# Altium PCB 48V-12V20A.PcbDoc (part 1 of 2)
Units mm, origin at the board's own origin, x right, y up, seen from the top; angles counter-clockwise.
Board outline 100 x 60 mm, 4 copper layers (Top Layer, GND02, POWER, Bottom Layer), stack 0.742 mm thick; 87 components, 43 nets, 281 pads, 430 vias.
Unrouted connection lines stored in the file: 18.
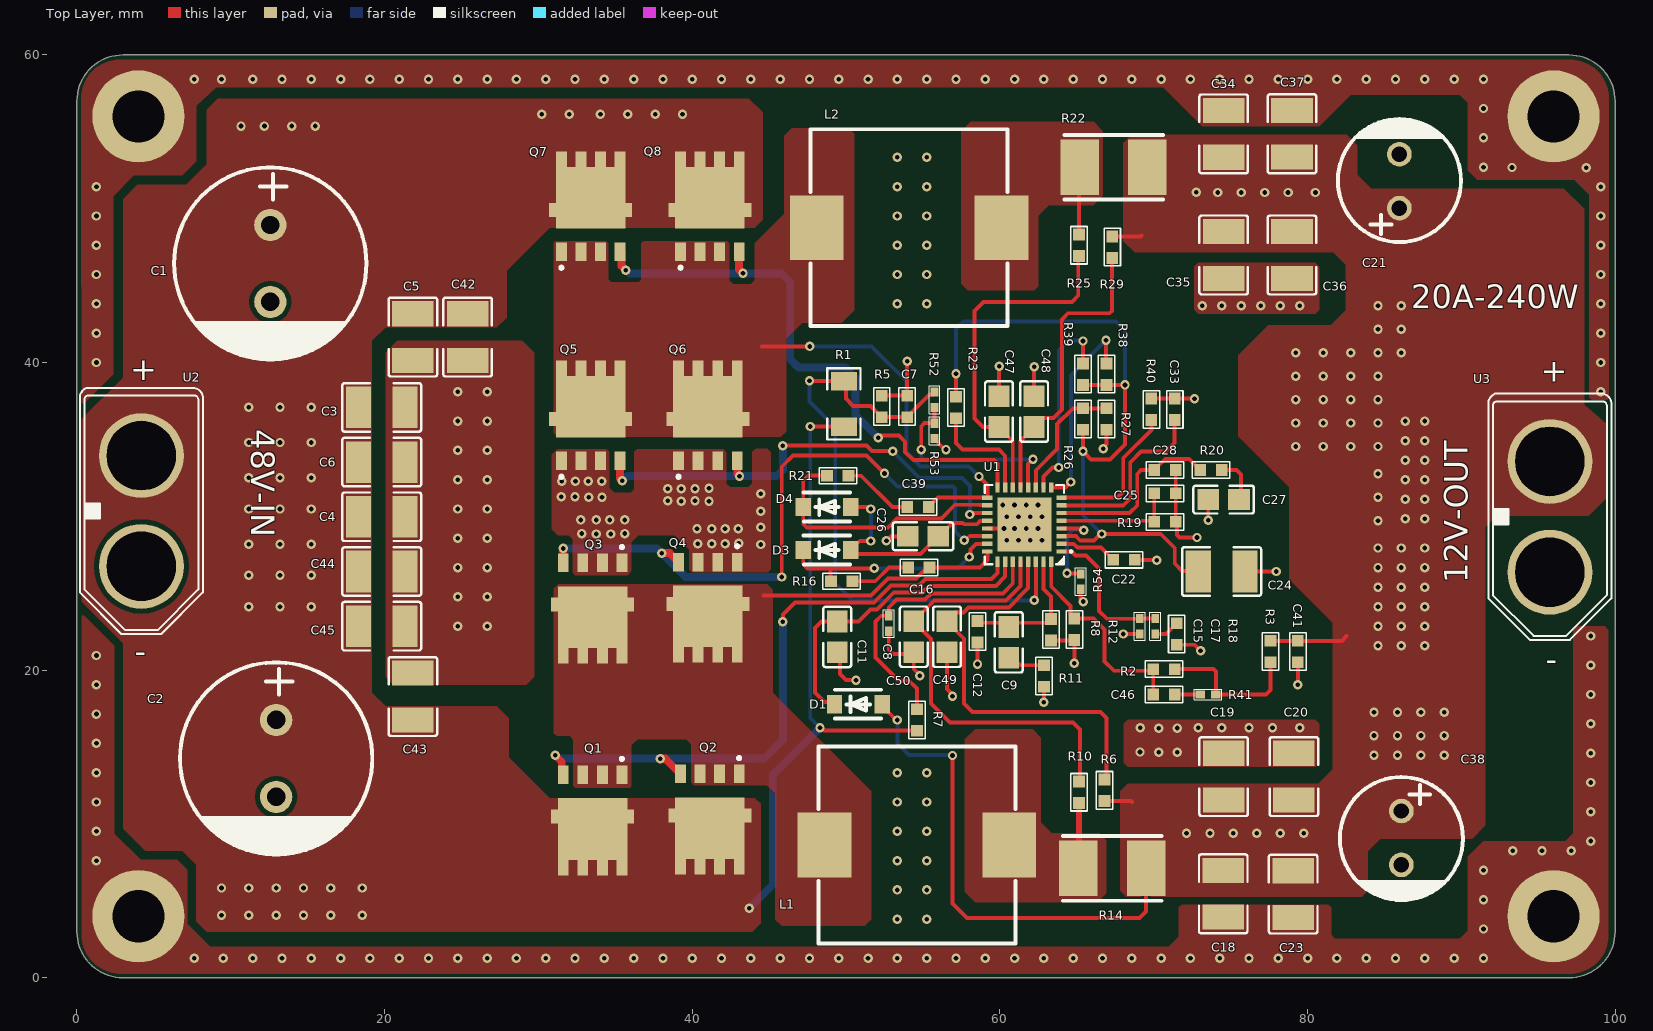
[diagram p0: Top Layer view]
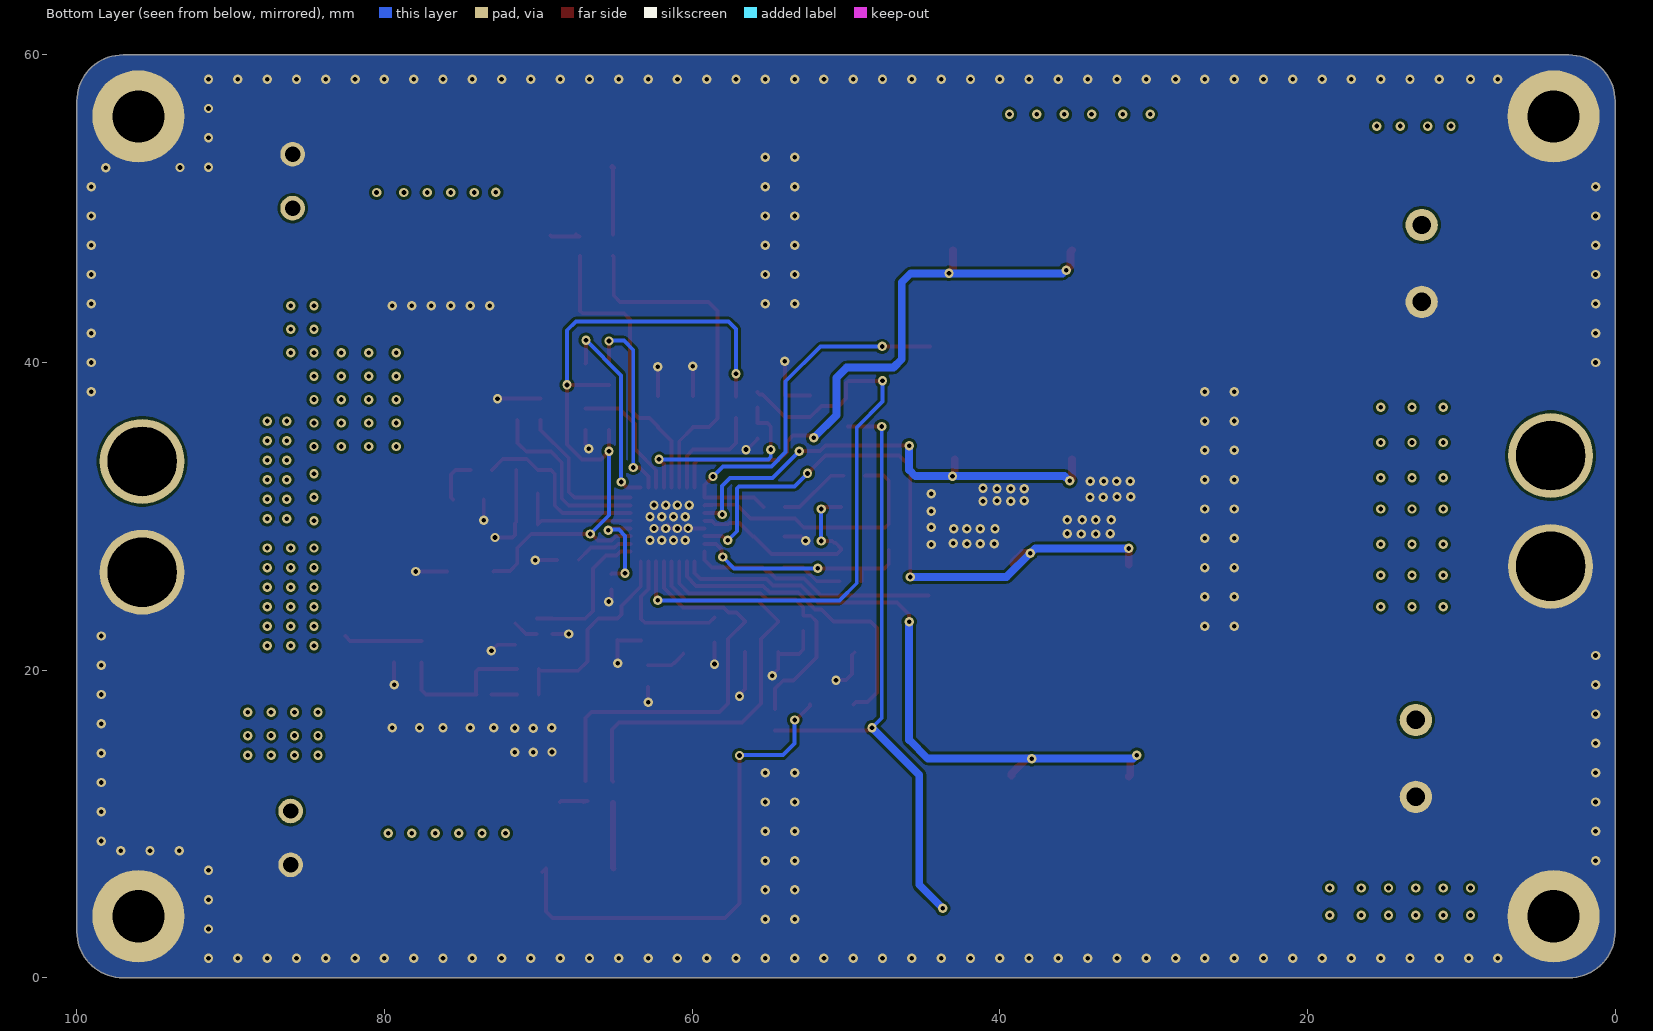
[diagram p1: Bottom Layer view, seen from below]
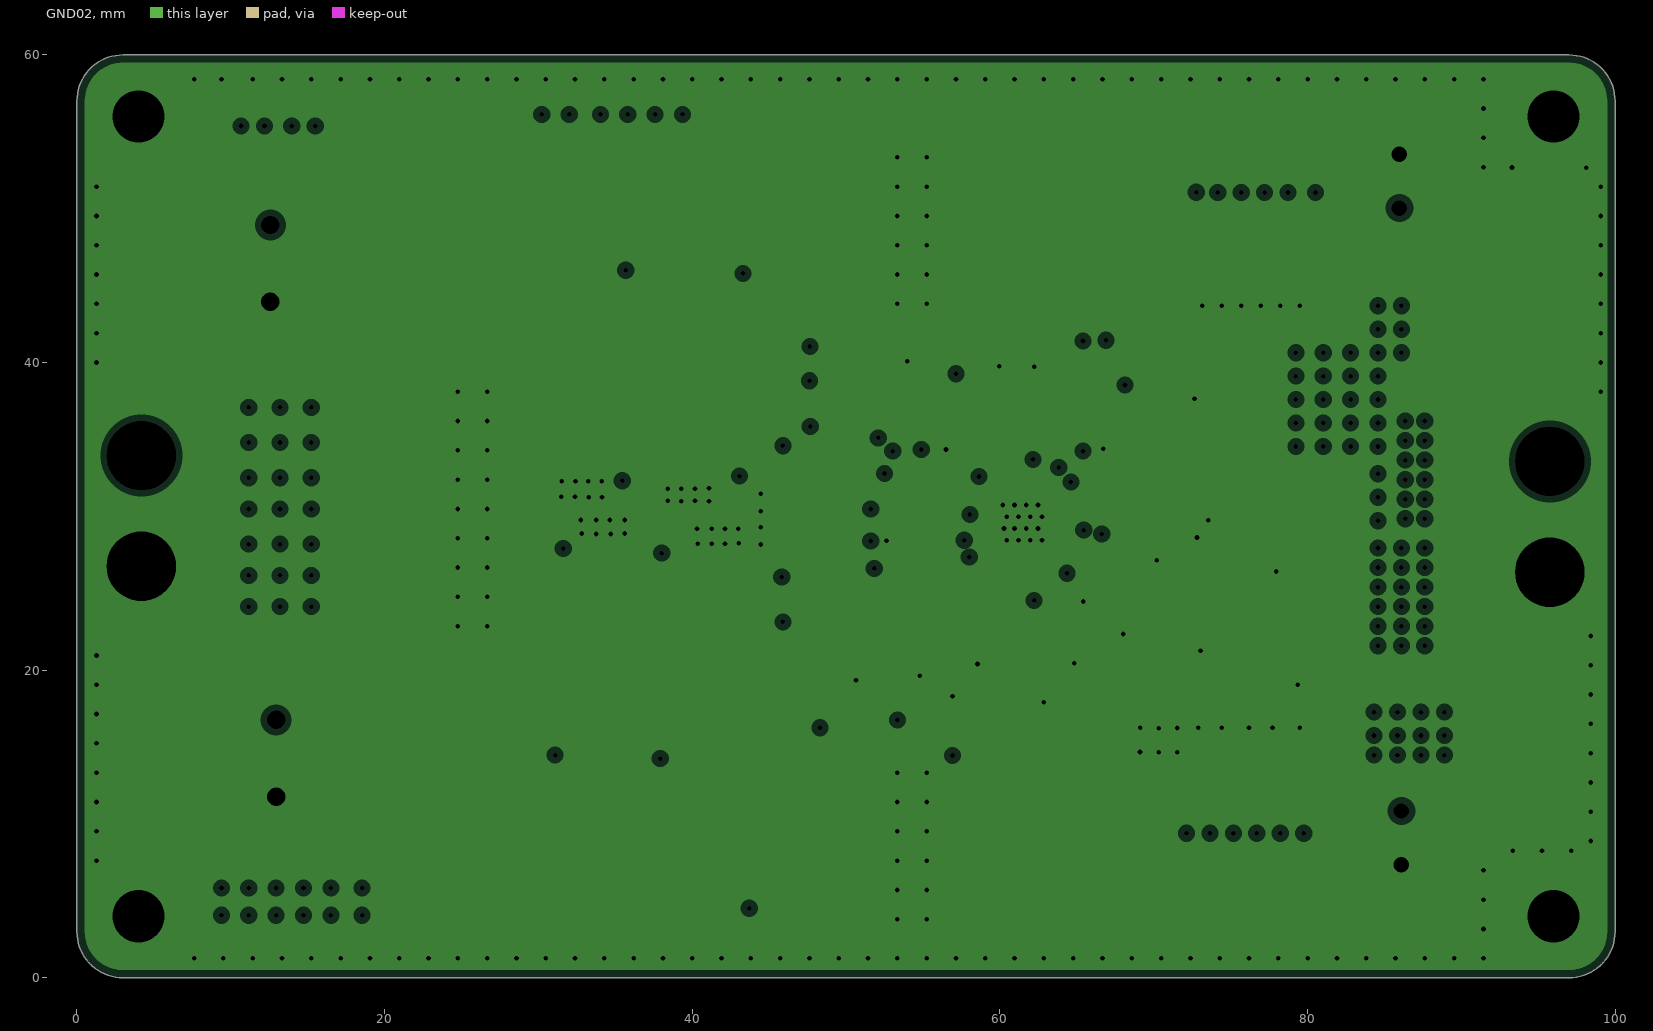
[diagram p2: GND02, clearances drawn from the general rule]
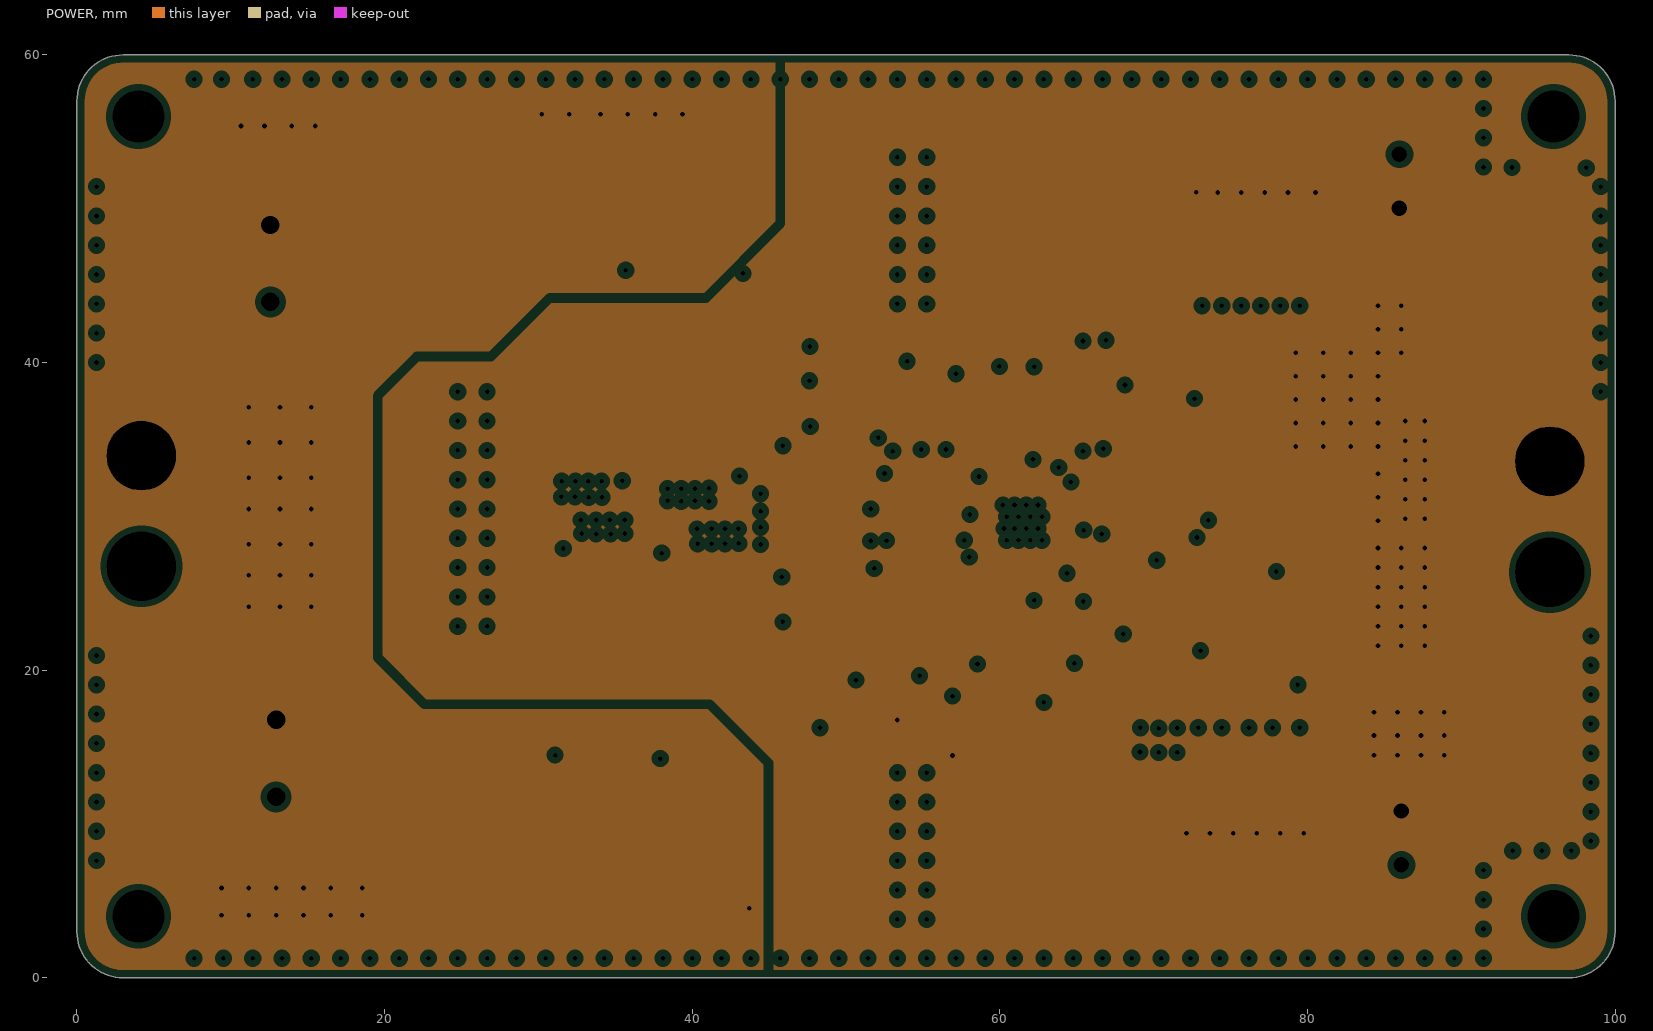
[diagram p3: POWER, clearances drawn from the general rule]
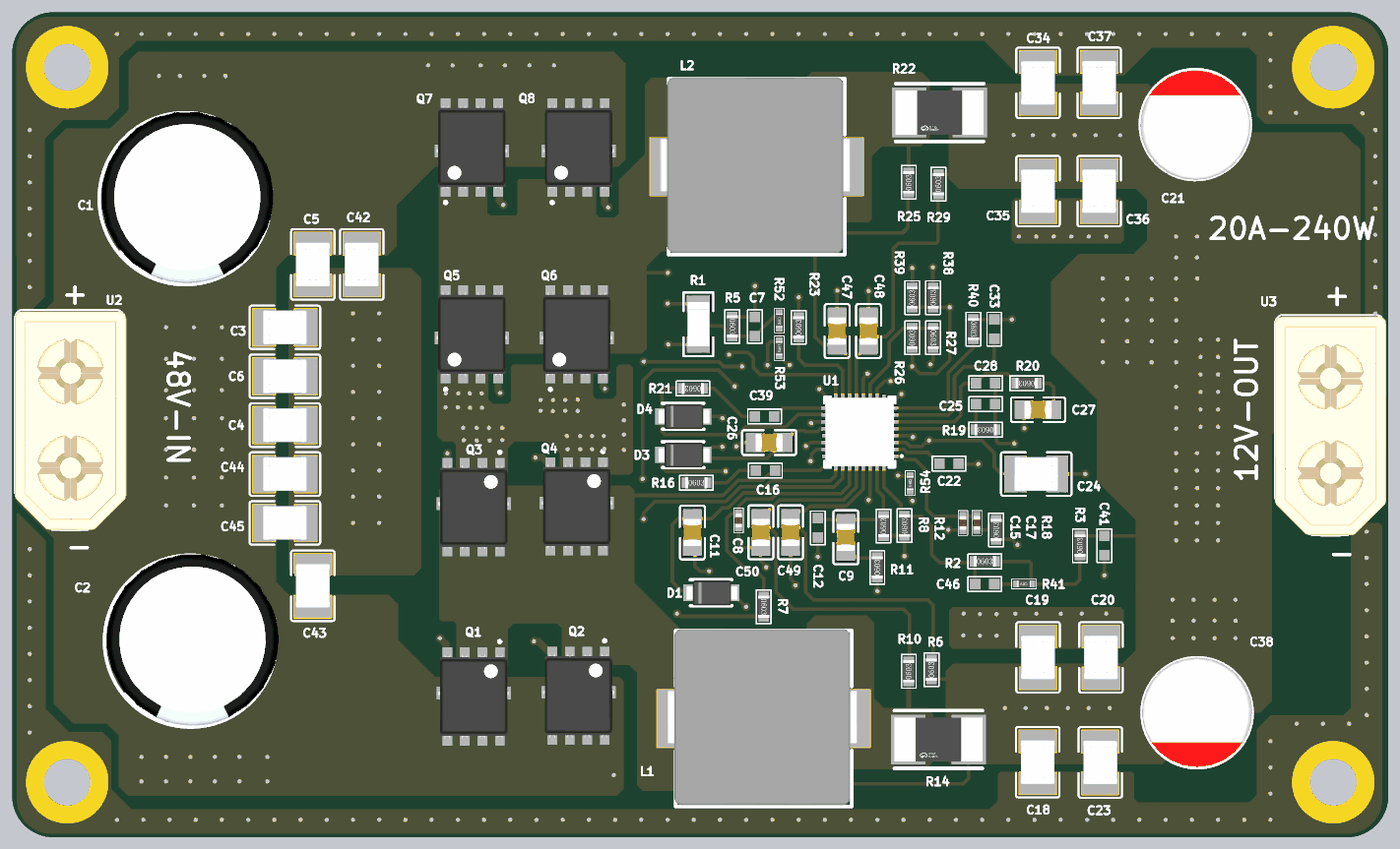
[diagram p4: 3D render of the assembled board from above, using the file's embedded part models]

## Layer stack, top to bottom
Top Solder: solder mask 0.0102, Solder Resist, Dk 3.5
Top Layer: signal copper 0.07
Dielectric 2: prepreg 0.0711, PP-006, Dk 4.1
GND02: plane copper 0.07, net GND
Dielectric 1: dielectric 0.32, FR-4, Dk 4.8
POWER: plane copper 0.07, net 12V
Dielectric 3: prepreg 0.0711, PP-006, Dk 4.1
Bottom Layer: signal copper 0.07
Bottom Solder: solder mask 0.0102, Solder Resist, Dk 3.5

## Board outline
0,3 0,57 cw(c3,57) 3,60 97,60 cw(c97,57) 100,57 100,3 cw(c97,3) 97,0 3,0 cw(c3,3)

## Design rules (kind name [scope] priority, off if disabled: settings)
Clearance [All] p1: gap=0.178 ignorepadtopadclearanceinfootprint=FALSE
DiffPairsRouting 100ohm [InDifferentialPairClass('100OHM')] p1: maxlimit=0.203 minlimit=0.203 mostfreqgap=0.203 toplayer_minwidth=0.152 toplayer_maxwidth=0.152 toplayer_prefwidth=0.152 bottomlayer_minwidth=0.152 bottomlayer_maxwidth=0.152 bottomlayer_prefwidth=0.152 maxuncoupledlength=12.7
DiffPairsRouting 120ohm [InDifferentialPairClass('120OHM')] p2: maxlimit=0.178 minlimit=0.178 mostfreqgap=0.178 toplayer_minwidth=0.127 toplayer_maxwidth=0.127 toplayer_prefwidth=0.127 bottomlayer_minwidth=0.127 bottomlayer_maxwidth=0.127 bottomlayer_prefwidth=0.127 maxuncoupledlength=12.7
MatchedLengths [InDifferentialPairClass('All Differential Pairs')] p1: tolerance=0.127 checknetsindiffpair=TRUE checkdiffpairvsdiffpair=FALSE checkxsignals=FALSE checkothers=FALSE
PlaneClearance [All] p1: clearance=0.406
PlaneConnect PlaneConnect_PWR [InPadClass('PWR')] p1: planeconnectstyle=Direct reliefexpansion=0.508 reliefentries=4 reliefconductorwidth=0.254 reliefairgap=0.254
PlaneConnect [All] p2: planeconnectstyle=Direct reliefexpansion=0.508 reliefentries=4 reliefconductorwidth=0.762 reliefairgap=0.254
PolygonConnect PolygonConnect_PWR [InPadClass('PWR')] p1: connectstyle=Direct reliefconductorwidth=0.254 reliefentries=4 polygonreliefangle="90 Angle" airgapwidth=0.254
PolygonConnect [All] p2: connectstyle=Direct reliefconductorwidth=0.762 reliefentries=4 polygonreliefangle="90 Angle" airgapwidth=0.254
RoutingVias [All] p1: holewidth=0.305 width=0.61 viastyle="Through Hole" minholewidth=0.305 minwidth=0.61 maxholewidth=0.305 maxwidth=0.61
SilkToSilkClearance [All] p1: silktosilkclearance=0.003
SilkToSolderMaskClearance [IsPad] p1: minsilkscreentomaskgap=0.003 clearancetoexposedcopper=TRUE
SolderMaskExpansion [IsVia And Not (Name Like 'Test*')] p1: expansion=-0.61 istentingtop=TRUE
Width [All] p1: maxlimit=2.54 minlimit=0.178 preferedwidth=0.203 minimp=50.000000 maximp=50.000000 favimp=50.000000
25 further rules are at their usual default settings.

## Components (designator, comment, footprint, x,y, rotation, side; value= is the part's Value field where it differs from the comment)
C1 "220uF" CAP-TH_BD12.5-P5.00-D0.6-FD 12.573,46.442 r270 top
C2 "220uF" CAP-TH_BD12.5-P5.00-D0.6-FD 12.954,14.264 r270 top
C3 "4.7uF" C1210 19.819,37.084 r0 top
C4 "4.7uF" C1210 19.819,29.972 r0 top
C5 "4.7uF" C1210 21.844,41.656 r270 top
C6 "4.7uF" C1210 19.819,33.528 r0 top
C7 "1nF" C0603 53.975,37.148 r270 top
C8 "100nF" C0402 52.781,23.038 r270 top
C9 "10nF" C0805 60.579,21.809 r90 top
C11 "10uF" C0805 49.428,22.165 r270 top
C12 "100pF" C0603 58.547,22.504 r90 top
C15 "220pF" C0402 69.088,22.852 r90 top
C16 "470nF" C0603 54.737,26.67 r0 top
C17 "4.7nF" C0402 70.104,22.86 r90 top
C18 "22uF" C1210 74.524,5.461 r90 top
C19 "22uF" C1210 74.549,13.081 r270 top
C20 "22uF" C1210 79.121,13.081 r270 top
C21 "1000uF" CAP-TH_BD8.0-P3.50-D0.6-FD-H17.0 85.979,51.791 r90 top
C22 "47nF" C0603 68.072,27.178 r0 top
C23 "22uF" C1210 79.07,5.442 r90 top
C24 "10uF" C1210 74.422,26.416 r180 top
C25 "DNP" C0603 70.739,31.496 r180 top value=470pF
C26 "10uF" C0805 55.007,28.702 r180 top
C27 "10nF" C0805 74.549,31.09 r0 top
C28 "820pF" C0603 70.739,33.02 r180 top
C33 "DNP" C0603 71.374,36.957 r270 top value=470pF
C34 "22uF" C1210 74.549,54.864 r90 top
C35 "22uF" C1210 74.549,46.99 r270 top
C36 "22uF" C1210 78.994,46.99 r270 top
C37 "22uF" C1210 78.994,54.871 r90 top
C38 "1000uF" CAP-TH_BD8.0-P3.50-D0.6-FD-H17.0 86.106,9.093 r270 top
C39 "470nF" C0603 54.673,30.607 r180 top
C41 "100nF" C0603 79.375,21.209 r270 top
C42 "4.7uF" C1210 25.4,41.656 r270 top
C43 "4.7uF" C1210 21.844,18.288 r90 top
C44 "4.7uF" C1210 19.819,26.416 r0 top
C45 "4.7uF" C1210 19.819,22.86 r0 top
C46 "100pF" C0603 70.675,18.415 r0 top
C47 "10nF" C0805 59.944,36.814 r270 top
C48 "10nF" C0805 62.23,36.814 r270 top
C49 "10nF" C0805 56.566,22.174 r270 top
C50 "10nF" C0805 54.407,22.174 r270 top
D1 "MBR1H100SFT3G" SOD-123F_L2.8-W1.8-LS3.7-RD 50.8,17.78 r0 top
D3 "MBR1H100SFT3G" SOD-123F_L2.8-W1.8-LS3.7-RD 48.768,27.813 r0 top
D4 "MBR1H100SFT3G" SOD-123F_L2.8-W1.8-LS3.7-RD 48.768,30.607 r0 top
L1 "6.8uH" IND-SMD_L12.8-W12.8-LS13.8_CYA1265 54.61,8.636 r0 top
L2 "6.8uH" IND-SMD_L12.8-W12.8-LS13.8_CYA1265 54.102,48.768 r0 top
Q1 "RBE067N10R1SZN6#HB0" RBA80N10EANS4UA07 33.528,10.231 r180 top
Q2 "RBE067N10R1SZN6#HB0" RBA80N10EANS4UA07 41.148,10.287 r180 top
Q3 "RBE067N10R1SZN6#HB0" RBA80N10EANS4UA07 33.528,24.003 r180 top
Q4 "RBE067N10R1SZN6#HB0" RBA80N10EANS4UA07 41.021,24.059 r180 top
Q5 "RBE067N10R1SZN6#HB0" RBA80N10EANS4UA07 33.401,36.576 r0 top
Q6 "RBE067N10R1SZN6#HB0" RBA80N10EANS4UA07 41.021,36.576 r0 top
Q7 "RBE067N10R1SZN6#HB0" RBA80N10EANS4UA07 33.401,50.165 r0 top
Q8 "RBE067N10R1SZN6#HB0" RBA80N10EANS4UA07 41.148,50.165 r0 top
R1 "430kΩ" R1206 49.86,37.313 r270 top
R2 "48.7kΩ" R0603 70.675,20.066 r0 top
R3 "20Ω" R0603 77.597,21.209 r90 top
R5 "48.7kΩ" R0603 52.324,37.148 r270 top
R6 "1Ω" R0603 66.802,12.192 r90 top
R7 "5.1Ω" R0603 54.61,16.764 r270 top
R8 "21kΩ" R0603 63.322,22.631 r90 top
R10 "1Ω" R0603 65.151,12.065 r90 top
R11 "1kΩ" R0603 62.865,19.621 r90 top
R12 "3.48kΩ" R0603 64.846,22.657 r90 top
R14 "4mΩ" RES-SMD_L6.4-W3.2_RLP25 67.31,7.112 r0 top
R16 "3.3Ω" R0603 49.72,25.781 r0 top
R18 "21kΩ" R0603 71.501,22.352 r90 top
R19 "169kΩ" R0603 70.739,29.642 r180 top
R20 "2.7kΩ" R0603 73.724,33.02 r180 top
R21 "3.3Ω" R0603 49.467,32.639 r180 top
R22 "4mΩ" RES-SMD_L6.4-W3.2_RLP25 67.396,52.705 r0 top
R23 "100kΩ" R0603 57.15,37.084 r90 top
R25 "1Ω" R0603 65.151,47.625 r90 top
R26 "100kΩ" R0603 65.405,36.322 r90 top
R27 "DNP" R0603 66.929,36.322 r270 top value=100kΩ
R29 "1Ω" R0603 67.31,47.498 r90 top
R38 "48.7kΩ" R0603 66.929,39.243 r90 top
R39 "48.7kΩ" R0603 65.405,39.243 r90 top
R40 "48.7kΩ" R0603 69.85,36.957 r270 top
R41 "0Ω" R0402 73.533,18.415 r0 top
R52 "0Ω" R0402 55.753,37.584 r90 top
R53 "DNP" R0402 55.753,35.56 r90 top value=22Ω
R54 "0Ω" R0402 65.253,25.756 r90 top
U1 "ISL81802FRTZ-T" TQFN-32_L5.0-W5.0-P0.50-TL-EP3.5 61.595,29.464 r180 top
U2 "XT60PB-M.G.Y" CONN-TH_XT60PB-M 4.191,30.353 r90 top
U3 "XT60PB-M.G.Y" CONN-TH_XT60PB-M 95.758,29.972 r90 top

## Footprints (in the part's own frame and the unit in brackets; to place one, negate y for a bottom-side part, rotate by r counter-clockwise, add the part's x,y. Pads: shape width x height; smd on the part's side, far side on the other; paste and mask are expansions set on the pad)
C0402 [mm] "Chip Capacitor, Body 1.0x0.5mm, IPC High Density"
  rect 0.6x0.5 smd: 1(-0.5,0) 2(0.5,0)
  silkscreen extent -0.9,-0.35 0.9,0.35, body extent -0.5,-0.25 0.5,0.25, height 0.48
C0603 [mil] "Capacitor"
  rect 30x30 smd: 1(-27.5,0) 2(27.5,0)
  silkscreen extent -48,-21 48,21, body extent -35,-15 35,15, height 33
C0805 [mm]
  rect 1.41x1.35 smd paste-100 mask+0.051: 1(-1,0) 2(1,0)
  silkscreen extent -1.96,-0.9 1.96,0.9, body extent -1,-0.65 1,0.65, height 1.3
C1210 [mm]
  rect 1.635x2.7 smd paste-100 mask+0.051: 1(-1.517,0) 2(1.517,0)
  silkscreen extent -2.56,-1.58 2.56,1.58, body extent -1.6,-1.25 1.6,1.25, height 2.5
CAP-TH_BD8.0-P3.50-D0.6-FD-H17.0 [mm]
  round 1.6 hole 1: 1(-1.75,0) 2(1.75,0)
  silkscreen extent -3.96,-4 4.04,4, body extent -4,-4 4,4, height 17
CAP-TH_BD12.5-P5.00-D0.6-FD [mm]
  round 2.1 hole 1.2 paste+0 mask+0.05: 1(-2.5,0) 2(2.5,0)
  silkscreen extent -6.25,-6.25 6.25,6.25, body extent -6.35,-6.1 6.15,6.4, height 19.91
CONN-TH_XT60PB-M [mm]
  round 5.517 hole 4.501 slot 4.506 at 0 deg: 1(3.599,0) 2(-3.602,0)
  silkscreen extent -8,-4 8,4, body extent -8.1,-4.1 7.9,4, height 16
IND-SMD_L12.8-W12.8-LS13.8_CYA1265 [mm]
  rect 3.5x4.2 smd paste+0 mask+0.05: 1(-6,0) 2(6,0)
  silkscreen extent -6.4,-6.4 6.4,6.4, body extent -7,-6.3 6.8,6.51, height 6.5
R0402 [mm]
  rect 0.6x0.5 smd: 1(-0.5,0) 2(0.5,0)
  silkscreen extent -0.9,-0.35 0.9,0.35, body extent -0.5,-0.25 0.5,0.25, height 0.35
R0603 [mil]
  rect 30x30 smd: 1(-27.5,0) 2(27.5,0)
  silkscreen extent -48,-21 48,21, body extent -31,-16 32,16, height 18
R1206 [mil]
  rect 47.5x67 smd paste-3937 mask+2: 1(-58.2,0) 2(58.2,0)
  silkscreen extent -91,-43 91,43, body extent -63,-31 63,32, height 22
RBA80N10EANS4UA07 [mm]
  rect 0.7x1.2 smd: 1(-1.905,-2.97) 2(-0.635,-2.97) 3(0.635,-2.97) 4(1.905,-2.97)
  rect 0.7x1.01 smd: 5(1.905,3.065) 6(0.635,3.065) 7(-0.635,3.065) 8(-1.905,3.065)
  rect 4.51x2.36 smd: 9(0,1.38)
  rect 5.4x0.91 smd: 10(0,-0.255)
  rect 4.51x0.74 smd: 11(0,-1.08)
  silkscreen extent -2,-4.1 -1.81,-3.9, body extent -2.58,-3.05 2.58,3.05, height 1
RES-SMD_L6.4-W3.2_RLP25 [mm]
  rect 2.5x3.6 smd: 1(-2.2,0) 2(2.2,0)
  silkscreen extent -3.2,-2.1 3.2,2.1, body extent -3.2,-1.6 3.2,1.6, height 0.54
SOD-123F_L2.8-W1.8-LS3.7-RD [mm]
  rect 1x1.2 smd: 1(-1.55,0) 2(1.55,0)
  silkscreen extent -1.52,-0.93 1.49,0.95, body extent -1.8,-0.91 1.9,0.89, height 1.31
TQFN-32_L5.0-W5.0-P0.50-TL-EP3.5 [mil]
  rect 26.2x11 smd paste-3937 mask+2: 1(-94.8,68.9) 2(-94.8,49.2) 3(-94.8,29.5) 4(-94.8,9.8) 5(-94.8,-9.9) 6(-94.8,-29.6) 7(-94.8,-49.2) 8(-94.8,-68.9) 17(94.8,-68.9) 18(94.8,-49.2) 19(94.8,-29.6) 20(94.8,-9.9) 21(94.8,9.8) 22(94.8,29.5) 23(94.8,49.2) 24(94.8,68.9)
  rect 11x26.2 smd paste-3937 mask+2: 9(-68.9,-94.8) 10(-49.2,-94.8) 11(-29.5,-94.8) 12(-9.8,-94.8) 13(9.9,-94.8) 14(29.6,-94.8) 15(49.2,-94.8) 16(68.9,-94.8) 25(68.9,94.8) 26(49.2,94.8) 27(29.6,94.8) 28(9.9,94.8) 29(-9.8,94.8) 30(-29.5,94.8) 31(-49.2,94.8) 32(-68.9,94.8)
  rect 137.8x137.8 smd paste-3937 mask+2: 33(0,0)
  silkscreen extent -123,-102 102,101, body extent -98,-98 99,99, height 37

## Part data
C1 C2: library part EKZN101ELL221MK25S, "容值:220uF;精度:±20%;额定电压:100V;纹波电流:1.105A@120Hz;等效串联电阻(ESR):-;", Equivalent Series Resistance(ESR)=-, JLCPCB Part Class="Extended Part", LCSC Part Name="220uF ±20% 100V", Manufacturer=NCC(日本贵弥功), Operating Temperature=-40℃~+105℃, Ripple Current=1.105A@120Hz, Tolerance=±20%, Voltage Rating=100V, AddInBom=yes, ConvertToPcb=yes, Datasheet=https://item.szlcsc.com/datasheet/EKZN101ELL221MK25S/3472715.html, Device=EKZN101ELL221MK25S, Diameter=12.5mm, FootprintName=CAP-TH_BD12.5-P5.00-D0.6-FD, Height - Seated (Max)=25mm, Lifetime=10000hrs@105℃, ManufacturerPart=EKZN101ELL221MK25S, ModelId=968d8ff988964aab8919b46a6a737be2聨0819f05c4eef4c71ace90d822a990e87, ModelName=CAP-TH_D12.5-H20.0-P5.00, ModelTransform=492.5187,492.11201,0,0,0,0,0,0,-137.795, Pin Spacing=5mm, Supplier=LCSC, Supplier Footprint=插件,D12.5xL25mm, SupplierPart=C2998532, Symbol=EKZN101ELL221MK25S
C3 C4 C5 C6 C42 C43 C44 C45: library part GCM32DC72A475KE02L, "容值:4.7uF;精度:±10%;额定电压:100V;温度系数:X7S;", JLCPCB Part Class="Extended Part", LCSC Part Name="4.7uF ±10% 100V", Manufacturer=muRata(村田), Temperature Coefficient=X7S, Tolerance=±10%, Voltage Rating=100V, AddInBom=yes, ConvertToPcb=yes, Datasheet=https://item.szlcsc.com/datasheet/GCM32DC72A475KE02L/983764.html, Device=GCM32DC72A475KE02L, FootprintName=C1210, ManufacturerPart=GCM32DC72A475KE02L, ModelId=833068e7fe044595a6eec77c56179455聨0819f05c4eef4c71ace90d822a990e87, ModelName=C1210_L3.2-W2.5-H2.5, ModelTransform=125.984,98.425,0,0,0,0,0,0,0, Supplier=LCSC, Supplier Footprint=1210, SupplierPart=C913445, Symbol=GCM32DC72A475KE02L
C7: library part CC0603KRX7R9BB102, "容值:1nF;精度:±10%;额定电压:50V;材质(温度系数):X7R;", JLCPCB Part Class="Extended Part", LCSC Part Name="1nF ±10% 50V", Manufacturer=YAGEO(国巨), Temperature Coefficient=X7R, Tolerance=±10%, Voltage Rated=50V, AddInBom=yes, ConvertToPcb=yes, Datasheet=https://atta.szlcsc.com/upload/public/pdf/source/20180910/C282072_33301C7F631E79921B82A8DAC6BCC5B3.pdf, Device=CC0603KRX7R9BB102, FootprintName=C0603, ManufacturerPart=CC0603KRX7R9BB102, ModelId=ac125912035d415993ca9572d50418b1聨0819f05c4eef4c71ace90d822a990e87, ModelName=C0603_L1.6-W0.8-H0.8, ModelTransform=62.992,31.496,0,0,0,0,0,0,0, Supplier=LCSC, Supplier Footprint=0603, SupplierPart=C100040, Symbol=CC0603KRX7R9BB102
C8: library part CGA0402X5R104K101GT, "容值:100nF;精度:±10%;额定电压:100V;温度系数:X5R;", JLCPCB Part Class="Extended Part", LCSC Part Name="100nF ±10% 100V", Manufacturer=HRE(芯声), Temperature Coefficient=X5R, Tolerance=±10%, Voltage Rating=100V, AddInBom=yes, ConvertToPcb=yes, Datasheet=https://item.szlcsc.com/datasheet/CGA0402X5R104K101GT/51423913.html, Device=CGA0402X5R104K101GT, FootprintName=C0402, ManufacturerPart=CGA0402X5R104K101GT, ModelId=36a51122f27c49738f86b3bfa98863e0聨0819f05c4eef4c71ace90d822a990e87, ModelName=C0402_L1.0-W0.5-H0.5, ModelTransform=39.37,19.685,0,0,0,0,0,0,0, Supplier=LCSC, Supplier Footprint=0402, SupplierPart=C49056139, Symbol=CGA0402X5R104K101GT
C9 C27: library part GRM2195C1H103FA01D, "容值:10nF;精度:±1%;额定电压:50V;材质(温度系数):C0G;", JLCPCB Part Class="Extended Part", LCSC Part Name="10nF ±1% 50V", Manufacturer=muRata(村田), Temperature Coefficient=C0G, Tolerance=±1%, Voltage Rated=50V, AddInBom=yes, ConvertToPcb=yes, Datasheet=https://atta.szlcsc.com/upload/public/pdf/source/20200305/C490387_23319AE8C154DEB24C505E6C82A8106A.pdf, Device=GRM2195C1H103FA01D, FootprintName=C0805, ManufacturerPart=GRM2195C1H103FA01D, ModelId=1ba041120af144c991958decab20d241聨0819f05c4eef4c71ace90d822a990e87, ModelName=C0805_L2.0-W1.3-H1.3, ModelTransform=78.74,51.181,0,0,0,0,0,0.0005,0, Supplier=LCSC, Supplier Footprint=0805, SupplierPart=C441760, Symbol=GRM2195C1H103FA01D
C11: library part HGC0805R5106K500NSLJ, "容值:10uF;精度:±10%;额定电压:50V;温度系数:X5R;", JLCPCB Part Class="Extended Part", LCSC Part Name="10uF ±10% 50V", Manufacturer=Chinocera(华瓷), Temperature Coefficient=X5R, Tolerance=±10%, Voltage Rating=50V, AddInBom=yes, ConvertToPcb=yes, Datasheet=https://item.szlcsc.com/datasheet/HGC0805R5106K500NSLJ/23841135.html, Device=HGC0805R5106K500NSLJ, FootprintName=C0805, ManufacturerPart=HGC0805R5106K500NSLJ, ModelId=1ba041120af144c991958decab20d241聨0819f05c4eef4c71ace90d822a990e87, ModelName=C0805_L2.0-W1.3-H1.3, ModelTransform=78.74,51.181,0,0,0,0,0,0.0005,0, Supplier=LCSC, Supplier Footprint=0805, SupplierPart=C22367830, Symbol=HGC0805R5106K500NSLJ
C12 C46: library part CC0603JRNPO0BN101, "容值:100pF;精度:±5%;额定电压:100V;温度系数:NP0;", JLCPCB Part Class="Extended Part", LCSC Part Name="100pF ±5% 100V", Manufacturer=YAGEO(国巨), Temperature Coefficient=NP0, Tolerance=±5%, Voltage Rating=100V, AddInBom=yes, ConvertToPcb=yes, Datasheet=https://item.szlcsc.com/datasheet/CC0603JRNPO0BN101/108249.html, Device=CC0603JRNPO0BN101, FootprintName=C0603, ManufacturerPart=CC0603JRNPO0BN101, ModelId=ac125912035d415993ca9572d50418b1聨0819f05c4eef4c71ace90d822a990e87, ModelName=C0603_L1.6-W0.8-H0.8, ModelTransform=62.992,31.496,0,0,0,0,0,0,0, Supplier=LCSC, Supplier Footprint=0603, SupplierPart=C107033, Symbol=CC0603JRNPO0BN101
C15: library part 0402B221K500NT, "容值:220pF;精度:±10%;额定电压:50V;温度系数:X7R;", JLCPCB Part Class="Basic Part", LCSC Part Name="220pF ±10% 50V", Manufacturer=FH(风华), Temperature Coefficient=X7R, Tolerance=±10%, Voltage Rating=50V, AddInBom=yes, ConvertToPcb=yes, Datasheet=https://item.szlcsc.com/datasheet/0402B221K500NT/1882.html, Device=0402B221K500NT, FootprintName=C0402, ManufacturerPart=0402B221K500NT, ModelId=36a51122f27c49738f86b3bfa98863e0聨0819f05c4eef4c71ace90d822a990e87, ModelName=C0402_L1.0-W0.5-H0.5, ModelTransform=39.37,19.685,0,0,0,0,0,0,0, Supplier=LCSC, Supplier Footprint=0402, SupplierPart=C1530, Symbol=0402B221K500NT
C16 C39: library part GRM188R71E474KA12D, "容值:470nF;精度:±10%;额定电压:25V;温度系数:X7R;", JLCPCB Part Class="Extended Part", LCSC Part Name="470nF ±10% 25V", Manufacturer=muRata(村田), Temperature Coefficient=X7R, Tolerance=±10%, Voltage Rating=25V, AddInBom=yes, ConvertToPcb=yes, Datasheet=https://item.szlcsc.com/datasheet/GRM188R71E474KA12D/78179.html, Device=GRM188R71E474KA12D, FootprintName=C0603, ManufacturerPart=GRM188R71E474KA12D, ModelId=ac125912035d415993ca9572d50418b1聨0819f05c4eef4c71ace90d822a990e87, ModelName=C0603_L1.6-W0.8-H0.8, ModelTransform=62.992,31.496,0,0,0,0,0,0,0, Supplier=LCSC, Supplier Footprint=0603, SupplierPart=C77052, Symbol=GRM188R71E474KA12D
C17: library part GRM1555C1H472JE01D, "容值:4.7nF;精度:±5%;额定电压:50V;温度系数:C0G;", JLCPCB Part Class="Extended Part", LCSC Part Name="4.7nF ±5% 50V", Manufacturer=muRata(村田), Temperature Coefficient=C0G, Tolerance=±5%, Voltage Rating=50V, AddInBom=yes, ConvertToPcb=yes, Datasheet=https://item.szlcsc.com/datasheet/GRM1555C1H472JE01D/1609001.html, Device=GRM1555C1H472JE01D, FootprintName=C0402, ManufacturerPart=GRM1555C1H472JE01D, ModelId=36a51122f27c49738f86b3bfa98863e0聨0819f05c4eef4c71ace90d822a990e87, ModelName=C0402_L1.0-W0.5-H0.5, ModelTransform=39.37,19.685,0,0,0,0,0,0,0, Supplier=LCSC, Supplier Footprint=0402, SupplierPart=C1518204, Symbol=GRM1555C1H472JE01D
C18 C19 C20 C23 C34 C35 C36 C37: library part GRM32ER71E226KE15L, "容值:22uF;精度:±10%;额定电压:25V;温度系数:X7R;", JLCPCB Part Class="Extended Part", LCSC Part Name="22uF ±10% 25V", Manufacturer=muRata(村田), Temperature Coefficient=X7R, Tolerance=±10%, Voltage Rating=25V, AddInBom=yes, ConvertToPcb=yes, Datasheet=https://item.szlcsc.com/datasheet/GRM32ER71E226KE15L/22114.html, Device=GRM32ER71E226KE15L, FootprintName=C1210, ManufacturerPart=GRM32ER71E226KE15L, ModelId=833068e7fe044595a6eec77c56179455聨0819f05c4eef4c71ace90d822a990e87, ModelName=C1210_L3.2-W2.5-H2.5, ModelTransform=125.984,98.425,0,0,0,0,0,0,0, Supplier=LCSC, Supplier Footprint=1210, SupplierPart=C21397, Symbol=GRM32ER71E226KE15L
C21 C38: library part PB25V1000M8X17, "容值:1000uF;精度:±20%;额定电压:25V;纹波电流:4.5A@100kHz;等效串联电阻(ESR):16mΩ@100kHz;类型:聚合物;", Equivalent Series Resistance(ESR)=16mΩ@100kHz, JLCPCB Part Class="Extended Part", LCSC Part Name="1000uF ±20% 25V", Manufacturer=JIERR(捷而瑞), Operating Temperature=-55℃~+105℃, Ripple Current=4.5A@100kHz, Tolerance=±20%, Voltage Rating=25V, AddInBom=yes, ConvertToPcb=yes, Datasheet=https://item.szlcsc.com/datasheet/PB25V1000M8X17/54649587.html, Device=PB25V1000M8X17, Diameter=8mm, FootprintName=CAP-TH_BD8.0-P3.50-D0.6-FD-H17.0, Height - Seated (Max)=17mm, Lifetime=5000hrs@105℃, ManufacturerPart=PB25V1000M8X17, ModelId=8dbab90daa9543b98cbad4b58849852c聨0819f05c4eef4c71ace90d822a990e87, ModelName=CAP-TH_BD8.0-P3.50-D0.6-FD-H17.0, ModelTransform=314.96,314.99465,0,0,0,0,0,0,-196.85, Pin Spacing=3.5mm, Supplier=LCSC, Supplier Footprint=插件,D8xL17mm, SupplierPart=C51934175, Symbol=PB25V1000M8X17, Type=聚合物
C22: library part CC0603KRX7R8BB473, "容值:47nF;精度:±10%;额定电压:25V;温度系数:X7R;", JLCPCB Part Class="Extended Part", LCSC Part Name="47nF ±10% 25V", Manufacturer=YAGEO(国巨), Temperature Coefficient=X7R, Tolerance=±10%, Voltage Rating=25V, AddInBom=yes, ConvertToPcb=yes, Datasheet=https://item.szlcsc.com/datasheet/CC0603KRX7R8BB473/115047.html, Device=CC0603KRX7R8BB473, FootprintName=C0603, ManufacturerPart=CC0603KRX7R8BB473, ModelId=ac125912035d415993ca9572d50418b1聨0819f05c4eef4c71ace90d822a990e87, ModelName=C0603_L1.6-W0.8-H0.8, ModelTransform=62.992,31.496,0,0,0,0,0,0,0, Supplier=LCSC, Supplier Footprint=0603, SupplierPart=C113811, Symbol=CC0603KRX7R8BB473
C24: library part FS32X106K101EGG, "容值:10uF;精度:±10%;额定电压:100V;温度系数:X7R;", JLCPCB Part Class="Extended Part", LCSC Part Name="10uF ±10% 100V", Manufacturer=PSA(信昌电陶), Temperature Coefficient=X7R, Tolerance=±10%, Voltage Rating=100V, AddInBom=yes, ConvertToPcb=yes, Datasheet=https://item.szlcsc.com/datasheet/FS32X106K101EGG/5791227.html, Device=FS32X106K101EGG, FootprintName=C1210, ManufacturerPart=FS32X106K101EGG, ModelId=833068e7fe044595a6eec77c56179455聨0819f05c4eef4c71ace90d822a990e87, ModelName=C1210_L3.2-W2.5-H2.5, ModelTransform=125.984,98.425,0,0,0,0,0,0,0, Supplier=LCSC, Supplier Footprint=1210, SupplierPart=C5156756, Symbol=FS32X106K101EGG
C25 C33: library part CC0603KRX7R8BB471, "容值:470pF;精度:±10%;额定电压:25V;温度系数:X7R;", JLCPCB Part Class="Extended Part", LCSC Part Name="470pF ±10% 25V", Manufacturer=YAGEO(国巨), Temperature Coefficient=X7R, Tolerance=±10%, Voltage Rating=25V, AddInBom=yes, ConvertToPcb=yes, Datasheet=https://item.szlcsc.com/datasheet/CC0603KRX7R8BB471/536084.html, Device=CC0603KRX7R8BB471, FootprintName=C0603, ManufacturerPart=CC0603KRX7R8BB471, ModelId=ac125912035d415993ca9572d50418b1聨0819f05c4eef4c71ace90d822a990e87, ModelName=C0603_L1.6-W0.8-H0.8, ModelTransform=62.992,31.496,0,0,0,0,0,0,0, Supplier=LCSC, Supplier Footprint=0603, SupplierPart=C519413, Symbol=CC0603KRX7R8BB471
C26: library part GRM21BC71C106KE11L, "容值:10uF;精度:±10%;额定电压:16V;温度系数:X7S;", JLCPCB Part Class="Extended Part", LCSC Part Name="10uF ±10% 16V", Manufacturer=muRata(村田), Temperature Coefficient=X7S, Tolerance=±10%, Voltage Rating=16V, AddInBom=yes, ConvertToPcb=yes, Datasheet=https://item.szlcsc.com/datasheet/GRM21BC71C106KE11L/173700.html, Device=GRM21BC71C106KE11L, FootprintName=C0805, ManufacturerPart=GRM21BC71C106KE11L, ModelId=1ba041120af144c991958decab20d241聨0819f05c4eef4c71ace90d822a990e87, ModelName=C0805_L2.0-W1.3-H1.3, ModelTransform=78.74,51.181,0,0,0,0,0,0.0005,0, Supplier=LCSC, Supplier Footprint=0805, SupplierPart=C162319, Symbol=GRM21BC71C106KE11L
C28: library part 0603B821K500NT, "容值:820pF;精度:±10%;额定电压:50V;温度系数:X7R;", JLCPCB Part Class="Extended Part", LCSC Part Name="820pF ±10% 50V", Manufacturer=FH(风华), Temperature Coefficient=X7R, Tolerance=±10%, Voltage Rating=50V, AddInBom=yes, ConvertToPcb=yes, Datasheet=https://item.szlcsc.com/datasheet/0603B821K500NT/1984.html, Device=0603B821K500NT, FootprintName=C0603, ManufacturerPart=0603B821K500NT, ModelId=ac125912035d415993ca9572d50418b1聨0819f05c4eef4c71ace90d822a990e87, ModelName=C0603_L1.6-W0.8-H0.8, ModelTransform=62.992,31.496,0,0,0,0,0,0,0, Supplier=LCSC, Supplier Footprint=0603, SupplierPart=C1632, Symbol=0603B821K500NT
C41: library part CL10B104KC8NNNC, "容值:100nF;精度:±10%;额定电压:100V;温度系数:X7R;", JLCPCB Part Class="Extended Part", LCSC Part Name="100nF ±10% 100V", Manufacturer=SAMSUNG(三星), Temperature Coefficient=X7R, Tolerance=±10%, Voltage Rating=100V, AddInBom=yes, ConvertToPcb=yes, Datasheet=https://item.szlcsc.com/datasheet/CL10B104KC8NNNC/16407.html, Device=CL10B104KC8NNNC, FootprintName=C0603, ManufacturerPart=CL10B104KC8NNNC, ModelId=ac125912035d415993ca9572d50418b1聨0819f05c4eef4c71ace90d822a990e87, ModelName=C0603_L1.6-W0.8-H0.8, ModelTransform=62.992,31.496,0,0,0,0,0,0,0, Supplier=LCSC, Supplier Footprint=0603, SupplierPart=C15725, Symbol=CL10B104KC8NNNC
C47 C48 C49 C50: library part CL21B103KCANNNC, "容值:10nF;精度:±10%;额定电压:100V;温度系数:X7R;", JLCPCB Part Class="Extended Part", LCSC Part Name="10nF ±10% 100V", Manufacturer=SAMSUNG(三星), Temperature Coefficient=X7R, Tolerance=±10%, Voltage Rating=100V, AddInBom=yes, ConvertToPcb=yes, Datasheet=https://item.szlcsc.com/datasheet/CL21B103KCANNNC/19444.html, Device=CL21B103KCANNNC, FootprintName=C0805, ManufacturerPart=CL21B103KCANNNC, ModelId=1ba041120af144c991958decab20d241聨0819f05c4eef4c71ace90d822a990e87, ModelName=C0805_L2.0-W1.3-H1.3, ModelTransform=78.74,51.181,0,0,0,0,0,0.0005,0, Supplier=LCSC, Supplier Footprint=0805, SupplierPart=C18741, Symbol=CL21B103KCANNNC
D1 D3 D4: "正向压降(Vf):760mV@1A;直流反向耐压(Vr):100V;整流电流:1A;", Current - Rectified=1A, JLCPCB Part Class="Extended Part", LCSC Part Name="电压:100V 电流:1A", Manufacturer=onsemi(安森美), Non-Repetitive Peak Forward Surge Current=50A, Operating Junction Temperature Range=-65℃~+175℃, Reverse Leakage Current (Ir)=40uA@100V, Voltage - DC Reverse(Vr)=100V, Voltage - Forward(Vf@If)=760mV@1A, AddInBom=yes, ConvertToPcb=yes, Datasheet=https://item.szlcsc.com/datasheet/MBR1H100SFT3G/235575.html, Device=MBR1H100SFT3G, FootprintName=SOD-123F_L2.8-W1.8-LS3.7-RD, ManufacturerPart=MBR1H100SFT3G, ModelId=321bc188a2eb4b418ce08d06d1c3a1f1聨0819f05c4eef4c71ace90d822a990e87, ModelName=SOD-123FL_L2.8-W1.8-LS3.7-RD-1, ModelTransform=145.669,70.866,0,0,0,0,0,0.276,0, Supplier=LCSC, Supplier Footprint=SOD-123FL, SupplierPart=C235757, Symbol=MBR1H100SFT3G
L1 L2: library part CYA1265-6.8UH, "电感值:6.8uH;精度:±20%;额定电流:15A;饱和电流(Isat):28A;类型:一体成型电感;", Current - Saturation(Isat)=28A, Current Rating=15A, DC Resistance(DCR)=-, JLCPCB Part Class="Extended Part", LCSC Part Name="6.8uH ±20% 28A", Manufacturer="SHOU HAN(首韩)", Tolerance=±20%, AddInBom=yes, ConvertToPcb=yes, Datasheet=https://item.szlcsc.com/datasheet/CYA1265-6.8UH/20528550.html, Device=CYA1265-6.8UH, FootprintName=IND-SMD_L12.8-W12.8-LS13.8_CYA1265, ManufacturerPart=CYA1265-6.8UH, ModelId=f7b33e13773b407da2951f533edd9b8a聨0819f05c4eef4c71ace90d822a990e87, ModelName=IND-SMD_L12.8-W12.8-LS13.8_CYA1265, ModelTransform=543.306,504.3297,0,0,0,0,0,0,0, Supplier=LCSC, Supplier Footprint=SMD,13.8x12.8mm, SupplierPart=C19268667, Symbol=CYA1265-6.8UH, Type=一体成型电感
Q1 Q2 Q3 Q4 Q5 Q6 Q7 Q8: "MOSFET (N-Channel)", Manufacturer_Name="Renesas Electronics", Datasheet Link=https://www.renesas.com/en/products/rbe067n10r1szn6/part-details/rbe067n10r1szn6-hb0, Manufacturer_Part_Number=RBE067N10R1SZN6#HB0
R1: library part FRC1206F4303TS, "电阻类型:厚膜电阻;阻值:430kΩ;精度:±1%;功率:250mW;工作电压:200V;温度系数:±100ppm/℃;", JLCPCB Part Class="Extended Part", LCSC Part Name="430kΩ ±1% 250mW 厚膜电阻", Manufacturer=FOJAN(富捷), Operating Temperature=-55℃~+155℃, Power(Watts)=250mW, Temperature Coefficient=±100ppm/℃, Tolerance=±1%, Voltage-Supply(Max)=200V, AddInBom=yes, ConvertToPcb=yes, Device=FRC1206F4303TS, FootprintName=R1206, ManufacturerPart=FRC1206F4303TS, ModelId=89a1f13db2384da588040e0b3c55bf66聨0819f05c4eef4c71ace90d822a990e87, ModelName=R1206_L3.2-W1.6-H0.6, ModelTransform=125.984,62.992,0,0,0,0,0,0,0, Supplier=LCSC, Supplier Footprint=1206, SupplierPart=C2930429, Symbol="FRC1206F4303  TS", Type=厚膜电阻
R2 R5 R38 R39 R40: library part FRC0603F4872TS, "电阻类型:厚膜电阻;阻值:48.7kΩ;精度:±1%;功率:100mW;工作电压:75V;温度系数:±100ppm/℃;", JLCPCB Part Class="Extended Part", LCSC Part Name="48.7kΩ ±1% 100mW 厚膜电阻", Manufacturer=FOJAN(富捷), Operating Temperature=-55℃~+155℃, Power(Watts)=100mW, Temperature Coefficient=±100ppm/℃, Tolerance=±1%, Voltage-Supply(Max)=75V, AddInBom=yes, ConvertToPcb=yes, Datasheet=https://item.szlcsc.com/datasheet/FRC0603F4872TS/3279328.html, Device=FRC0603F4872TS, FootprintName=R0603, ManufacturerPart=FRC0603F4872TS, ModelId=fc143cca1e79419f9cd78b61e9279f08聨0819f05c4eef4c71ace90d822a990e87, ModelName=R0603, ModelTransform=31.8897,63.7794,0,90,0,0,0,0,0, Supplier=LCSC, Supplier Footprint=0603, SupplierPart=C2933226, Symbol=FRC0603F4872TS, Type=厚膜电阻
R3: library part FRC0603F20R0TS, "电阻类型:厚膜电阻;阻值:20Ω;精度:±1%;功率:100mW;工作电压:75V;温度系数:±100ppm/℃;", JLCPCB Part Class="Extended Part", LCSC Part Name="20Ω ±1% 100mW 厚膜电阻", Manufacturer=FOJAN(富捷), Operating Temperature=-55℃~+155℃, Power(Watts)=100mW, Temperature Coefficient=±100ppm/℃, Tolerance=±1%, Voltage-Supply(Max)=75V, AddInBom=yes, ConvertToPcb=yes, Device=FRC0603F20R0TS, FootprintName=R0603, ManufacturerPart=FRC0603F20R0TS, ModelId=fc143cca1e79419f9cd78b61e9279f08聨0819f05c4eef4c71ace90d822a990e87, ModelName=R0603, ModelTransform=31.8897,63.7794,0,90,0,0,0,0,0, Supplier=LCSC, Supplier Footprint=0603, SupplierPart=C2907012, Symbol=FRC0603F20R0TS, Type=厚膜电阻
R6 R10 R25 R29: library part AC0603FR-071RL, "电阻类型:厚膜电阻;阻值:1Ω;精度:±1%;功率:100mW;工作电压:75V;温度系数:±200ppm/℃;", JLCPCB Part Class="Extended Part", LCSC Part Name="厚膜电阻 1Ω ±1% 100mW", Manufacturer=YAGEO(国巨), Operating Temperature=-55℃~+155℃, Power(Watts)=100mW, Temperature Coefficient=±200ppm/℃, Tolerance=±1%, Voltage-Supply(Max)=75V, AddInBom=yes, ConvertToPcb=yes, Datasheet=https://item.szlcsc.com/datasheet/AC0603FR-071RL/156016.html, Device=AC0603FR-071RL, FootprintName=R0603, ManufacturerPart=AC0603FR-071RL, ModelId=fc143cca1e79419f9cd78b61e9279f08聨0819f05c4eef4c71ace90d822a990e87, ModelName=R0603, ModelTransform=31.8897,63.7794,0,90,0,0,0,0,0, Supplier=LCSC, Supplier Footprint=0603, SupplierPart=C144684, Symbol=AC0603FR-071RL, Type=厚膜电阻
R7: library part RC0603FR-075R1L, "电阻类型:厚膜电阻;阻值:5.1Ω;精度:±1%;功率:100mW;最大工作电压:75V;温度系数:±200ppm/℃;", JLCPCB Part Class="Extended Part", LCSC Part Name="厚膜电阻 5.1Ω ±1% 100mW", Manufacturer=YAGEO(国巨), Operating Temperature Range=-55℃~+155℃, Overload Voltage (Max)=75V, Power(Watts)=100mW, Temperature Coefficient=±200ppm/℃, Tolerance=±1%, AddInBom=yes, ConvertToPcb=yes, Datasheet=https://atta.szlcsc.com/upload/public/pdf/source/20180821/C275644_0D56F95EFF785E7D9A1FEF436B37DA78.pdf, Device=RC0603FR-075R1L, FootprintName=R0603, ManufacturerPart=RC0603FR-075R1L, ModelId=fc143cca1e79419f9cd78b61e9279f08聨0819f05c4eef4c71ace90d822a990e87, ModelName=R0603, ModelTransform=31.8897,63.7794,0,90,0,0,0,0,0, Supplier=LCSC, Supplier Footprint=0603, SupplierPart=C114626, Symbol=RC0603FR-075R1L, Type=厚膜电阻
R8 R18: library part 0603WAF2102T5E, "电阻类型:厚膜电阻;阻值:21kΩ;精度:±1%;功率:100mW;工作电压:75V;温度系数:±100ppm/℃;", JLCPCB Part Class="Extended Part", LCSC Part Name="21kΩ ±1% 100mW 厚膜电阻", Manufacturer=UNI-ROYAL(厚声), Operating Temperature=-55℃~+155℃, Power(Watts)=100mW, Temperature Coefficient=±100ppm/℃, Tolerance=±1%, Voltage-Supply(Max)=75V, AddInBom=yes, ConvertToPcb=yes, Datasheet=https://item.szlcsc.com/datasheet/0603WAF2102T5E/23683.html, Device=0603WAF2102T5E, FootprintName=R0603, ManufacturerPart=0603WAF2102T5E, ModelId=fc143cca1e79419f9cd78b61e9279f08聨0819f05c4eef4c71ace90d822a990e87, ModelName=R0603, ModelTransform=31.8897,63.7794,0,90,0,0,0,0,0, Supplier=LCSC, Supplier Footprint=0603, SupplierPart=C22956, Symbol=0603WAF2102T5E, Type=厚膜电阻
R11: library part FRC0603F1001TS, "电阻类型:厚膜电阻;阻值:1kΩ;精度:±1%;功率:100mW;工作电压:75V;温度系数:±100ppm/℃;", JLCPCB Part Class="Extended Part", LCSC Part Name="1kΩ ±1% 100mW 厚膜电阻", Manufacturer=FOJAN(富捷), Operating Temperature=-55℃~+155℃, Power(Watts)=100mW, Temperature Coefficient=±100ppm/℃, Tolerance=±1%, Voltage-Supply(Max)=75V, AddInBom=yes, ConvertToPcb=yes, Datasheet=https://item.szlcsc.com/datasheet/FRC0603F1001TS/3180515.html, Device=FRC0603F1001TS, FootprintName=R0603, ManufacturerPart=FRC0603F1001TS, ModelId=fc143cca1e79419f9cd78b61e9279f08聨0819f05c4eef4c71ace90d822a990e87, ModelName=R0603, ModelTransform=31.8897,63.7794,0,90,0,0,0,0,0, Supplier=LCSC, Supplier Footprint=0603, SupplierPart=C2907002, Symbol=FRC0603F1001TS, Type=厚膜电阻
R12: library part 0603WAF3481T5E, "电阻类型:厚膜电阻;阻值:3.48kΩ;精度:±1%;功率:100mW;工作电压:75V;温度系数:±100ppm/℃;", JLCPCB Part Class="Extended Part", LCSC Part Name="3.48kΩ ±1% 100mW 厚膜电阻", Manufacturer=UNI-ROYAL(厚声), Operating Temperature=-55℃~+155℃, Power(Watts)=100mW, Temperature Coefficient=±100ppm/℃, Tolerance=±1%, Voltage-Supply(Max)=75V, AddInBom=yes, ConvertToPcb=yes, Datasheet=https://item.szlcsc.com/datasheet/0603WAF3481T5E/23723.html, Device=0603WAF3481T5E, FootprintName=R0603, ManufacturerPart=0603WAF3481T5E, ModelId=fc143cca1e79419f9cd78b61e9279f08聨0819f05c4eef4c71ace90d822a990e87, ModelName=R0603, ModelTransform=31.8897,63.7794,0,90,0,0,0,0,0, Supplier=LCSC, Supplier Footprint=0603, SupplierPart=C22996, Symbol=0603WAF3481T5E, Type=厚膜电阻
R14 R22: library part FPM253WFR004TML, "电阻类型:采样电阻;阻值:4mΩ;精度:±1%;功率:3W;温度系数:±50ppm/℃;安装方式:贴片;", JLCPCB Part Class="Extended Part", LCSC Part Name="4mΩ ±1% 3W 合金电阻", Manufacturer=FOJAN(富捷), Power(Watts)=3W, Temperature Coefficient=±50ppm/℃, Tolerance=±1%, AddInBom=yes, ConvertToPcb=yes, Datasheet=https://item.szlcsc.com/datasheet/FPM253WFR004TML/8395311.html, Device=FPM253WFR004TML, FootprintName=RES-SMD_L6.4-W3.2_RLP25, ManufacturerPart=FPM253WFR004TML, ModelId=33857086d8cb41db859131c51044579d聨0819f05c4eef4c71ace90d822a990e87, ModelName=RES-SMD_L6.4-W3.2-H0.7, ModelTransform=251.968,125.984,0,0,0,0,0,0,0, Mounting Type=贴片, Supplier=LCSC, Supplier Footprint=2512, SupplierPart=C7420018, Symbol=FPM253WFR004TML, Type=采样电阻
R16 R21: library part FRC0603F3R30TS, "电阻类型:厚膜电阻;阻值:3.3Ω;精度:±1%;功率:100mW;工作电压:75V;温度系数:±200ppm/℃;", JLCPCB Part Class="Extended Part", LCSC Part Name="3.3Ω ±1% 100mW 厚膜电阻", Manufacturer=FOJAN(富捷), Operating Temperature=-55℃~+155℃, Power(Watts)=100mW, Temperature Coefficient=±200ppm/℃, Tolerance=±1%, Voltage-Supply(Max)=75V, AddInBom=yes, ConvertToPcb=yes, Device=FRC0603F3R30TS, FootprintName=R0603, ManufacturerPart=FRC0603F3R30TS, ModelId=fc143cca1e79419f9cd78b61e9279f08聨0819f05c4eef4c71ace90d822a990e87, ModelName=R0603, ModelTransform=31.8897,63.7794,0,90,0,0,0,0,0, Supplier=LCSC, Supplier Footprint=0603, SupplierPart=C2930016, Symbol=FRC0603F3R30TS, Type=厚膜电阻
R19: library part FRC0603F1693TS, "电阻类型:厚膜电阻;阻值:169kΩ;精度:±1%;功率:100mW;工作电压:75V;温度系数:±100ppm/℃;", JLCPCB Part Class="Extended Part", LCSC Part Name="169kΩ ±1% 100mW 厚膜电阻", Manufacturer=FOJAN(富捷), Operating Temperature=-55℃~+155℃, Power(Watts)=100mW, Temperature Coefficient=±100ppm/℃, Tolerance=±1%, Voltage-Supply(Max)=75V, AddInBom=yes, ConvertToPcb=yes, Datasheet=https://item.szlcsc.com/datasheet/FRC0603F1693TS/3519476.html, Device=FRC0603F1693TS, FootprintName=R0603, ManufacturerPart=FRC0603F1693TS, ModelId=fc143cca1e79419f9cd78b61e9279f08聨0819f05c4eef4c71ace90d822a990e87, ModelName=R0603, ModelTransform=31.8897,63.7794,0,90,0,0,0,0,0, Supplier=LCSC, Supplier Footprint=0603, SupplierPart=C3013192, Symbol=FRC0603F1693TS, Type=厚膜电阻
R20: library part FRC0603F2701TS, "电阻类型:厚膜电阻;阻值:2.7kΩ;精度:±1%;功率:100mW;工作电压:75V;温度系数:±100ppm/℃;", JLCPCB Part Class="Extended Part", LCSC Part Name="2.7kΩ ±1% 100mW 厚膜电阻", Manufacturer=FOJAN(富捷), Operating Temperature=-55℃~+155℃, Power(Watts)=100mW, Temperature Coefficient=±100ppm/℃, Tolerance=±1%, Voltage-Supply(Max)=75V, AddInBom=yes, ConvertToPcb=yes, Datasheet=https://item.szlcsc.com/datasheet/FRC0603F2701TS/3180521.html, Device=FRC0603F2701TS, FootprintName=R0603, ManufacturerPart=FRC0603F2701TS, ModelId=fc143cca1e79419f9cd78b61e9279f08聨0819f05c4eef4c71ace90d822a990e87, ModelName=R0603, ModelTransform=31.8897,63.7794,0,90,0,0,0,0,0, Supplier=LCSC, Supplier Footprint=0603, SupplierPart=C2907008, Symbol=FRC0603F2701TS, Type=厚膜电阻
R23 R26 R27: library part FRC0603F1003TS, "电阻类型:厚膜电阻;阻值:100kΩ;精度:±1%;功率:100mW;工作电压:75V;温度系数:±100ppm/℃;", JLCPCB Part Class="Extended Part", LCSC Part Name="100kΩ ±1% 100mW 厚膜电阻", Manufacturer=FOJAN(富捷), Operating Temperature=-55℃~+155℃, Power(Watts)=100mW, Temperature Coefficient=±100ppm/℃, Tolerance=±1%, Voltage-Supply(Max)=75V, AddInBom=yes, ConvertToPcb=yes, Datasheet=https://item.szlcsc.com/datasheet/FRC0603F1003TS/3180493.html, Device=FRC0603F1003TS, FootprintName=R0603, ManufacturerPart=FRC0603F1003TS, ModelId=fc143cca1e79419f9cd78b61e9279f08聨0819f05c4eef4c71ace90d822a990e87, ModelName=R0603, ModelTransform=31.8897,63.7794,0,90,0,0,0,0,0, Supplier=LCSC, Supplier Footprint=0603, SupplierPart=C2906980, Symbol=FRC0603F1003TS, Type=厚膜电阻
R41 R52: library part "FRC0402P000 TS", "电阻类型:厚膜电阻;阻值:0Ω;精度:±5%;功率:62.5mW;工作电压:50V;", JLCPCB Part Class="Extended Part", LCSC Part Name="0Ω ±5% 62.5mW 厚膜电阻", Manufacturer=FOJAN(富捷), Operating Temperature=-55℃~+155℃, Power(Watts)=62.5mW, Tolerance=±5%, Voltage-Supply(Max)=50V, AddInBom=yes, ConvertToPcb=yes, Datasheet=https://item.szlcsc.com/datasheet/FRC0402P000%2520TS/3180390.html, Device="FRC0402P000 TS", FootprintName=R0402, ManufacturerPart="FRC0402P000 TS", ModelId=98c88bc2b9094f218f3a3e30a7012738聨0819f05c4eef4c71ace90d822a990e87, ModelName=R0402_L1.0-W0.5-H0.4, ModelTransform=39.37,19.685,0,0,0,0,0,0,0, Supplier=LCSC, Supplier Footprint=0402, SupplierPart=C2906877, Symbol="FRC0402P000 TS", Type=厚膜电阻
R53: library part FRC0402F22R0TS, "电阻类型:厚膜电阻;阻值:22Ω;精度:±1%;功率:62.5mW;工作电压:50V;温度系数:±100ppm/℃;", JLCPCB Part Class="Extended Part", LCSC Part Name="22Ω ±1% 62.5mW 厚膜电阻", Manufacturer=FOJAN(富捷), Operating Temperature=-55℃~+155℃, Power(Watts)=62.5mW, Temperature Coefficient=±100ppm/℃, Tolerance=±1%, Voltage-Supply(Max)=50V, AddInBom=yes, ConvertToPcb=yes, Datasheet=https://item.szlcsc.com/datasheet/FRC0402F22R0TS/3266927.html, Device=FRC0402F22R0TS, FootprintName=R0402, ManufacturerPart=FRC0402F22R0TS, ModelId=98c88bc2b9094f218f3a3e30a7012738聨0819f05c4eef4c71ace90d822a990e87, ModelName=R0402_L1.0-W0.5-H0.4, ModelTransform=39.37,19.685,0,0,0,0,0,0,0, Supplier=LCSC, Supplier Footprint=0402, SupplierPart=C2929994, Symbol=FRC0402F22R0TS, Type=厚膜电阻
R54: library part FRC0402F0000TS, "电阻类型:厚膜电阻;阻值:0Ω;精度:±1%;功率:62.5mW;工作电压:50V;温度系数:±400ppm/℃;", JLCPCB Part Class="Extended Part", LCSC Part Name="0Ω ±1% 62.5mW 厚膜电阻", Manufacturer=FOJAN(富捷), Operating Temperature=-55℃~+155℃, Power(Watts)=62.5mW, Temperature Coefficient=±400ppm/℃, Tolerance=±1%, Voltage-Supply(Max)=50V, AddInBom=yes, ConvertToPcb=yes, Datasheet=https://item.szlcsc.com/datasheet/FRC0402F0000TS/3180371.html, Device=FRC0402F0000TS, FootprintName=R0402, ManufacturerPart=FRC0402F0000TS, ModelId=98c88bc2b9094f218f3a3e30a7012738聨0819f05c4eef4c71ace90d822a990e87, ModelName=R0402_L1.0-W0.5-H0.4, ModelTransform=39.37,19.685,0,0,0,0,0,0,0, Supplier=LCSC, Supplier Footprint=0402, SupplierPart=C2906858, Symbol=FRC0402F0000TS, Type=厚膜电阻
U1: "功能类型:降压型;工作电压:4.5V~80V;输出电压:800mV~76V;输出电流:-;输出类型:可调;", Frequency - Switching=100kHz~1MHz, JLCPCB Part Class="Extended Part", LCSC Part Name="降压型 4.5V~80V", Manufacturer=RENESAS(瑞萨)/IDT, Operating Temperature=-40℃~+125℃, Output Current=-, Output Voltage=800mV~76V, Quiescent Current=5.5mA, Voltage - Supply=4.5V~80V, AddInBom=yes, ConvertToPcb=yes, Datasheet=https://item.szlcsc.com/datasheet/ISL81802FRTZ-T/24370010.html, Device=ISL81802FRTZ-T, Features=轻载高效模式；内置LDO稳压器；频率同步；可调软启动；过流保护；EMI优化(抖频模式)；工作状态指示；输出电压跟随, FootprintName=TQFN-32_L5.0-W5.0-P0.50-TL-EP3.5, Function=降压型, ManufacturerPart=ISL81802FRTZ-T, ModelId=c031dd5c557943a0a1fef6f638ccfe2a聨0819f05c4eef4c71ace90d822a990e87, ModelName=TQFN-32_L5.0-W5.0-P0.50-TL-EP3.5, ModelTransform=196.92874,196.92874,0,0,0,0,0,0,0, Number of Outputs=2, Output Type=可调, Supplier=LCSC, Supplier Footprint=TQFN-32(5x5), SupplierPart=C22645503, Switch tube (built-in/external)=外置, Symbol=ISL81802FRTZ-T, Synchronous Rectifier=是, Topology=降压式
U2 U3: JLCPCB Part Class="Extended Part", LCSC Part Name="AMASS(艾迈斯)插头锂电池电调航模 板立式注塑型 2PIN 接头20A双芯PCB直插金 黄 公头XT60PB-M.G.Y", Manufacturer=AMASS(艾迈斯), AddInBom=yes, ConvertToPcb=yes, Datasheet=https://item.szlcsc.com/datasheet/XT60PB-M.G.Y/20526048.html, Device=XT60PB-M.G.Y, FootprintName=CONN-TH_XT60PB-M, ManufacturerPart=XT60PB-M.G.Y, ModelId=c4c5e22dc09643cc9d2346cb05dc9304聨0819f05c4eef4c71ace90d822a990e87, ModelName=CONN-TH_XT60PB-M, ModelTransform=629.92,318.897,0,0,0,0,0,0,-157.48, Supplier=LCSC, Supplier Footprint=-, SupplierPart=C19268037, Symbol=XT60PB-M.G.Y

## Free pads (board coordinates)
  round 6 hole 3.4: 0(4,4) 0(4,56) 0(96,4) 0(96,56)

## Via types
v1: diameter 0.61, hole 0.305, Top Layer to Bottom Layer, tented both sides, 430 vias

## Nets (pads, with @x,y where several pads share a name; then routed paths per layer and width w, separated by ;. In a path a pad name is that pad's centre, name@x,y a point inside that pad or via, vN(x,y) a via of type N, cw(c..) or ccw(c..) an arc to the next point about the centre after c; other vN are vias at no path point)
12V: C18.2 C19.2 C20.2 C21.1 C23.2 C34.1 C35.1 C36.1 C37.1 C38.1 C41.1 D1.2 R3.2 R6.1 R14.2 R22.2 R29.2 U3.1 | length 42.2
  Top Layer w0.254: D1.2 52.35,17.68 53.266,16.764 v1(53.34,16.764) ; v1(56.921,14.453) 56.921,4.826 57.861,3.886 69.088,3.886 69.51,4.308 R14.2 R14.2@69.748,6.873 ; R6.1@67.056,11.43 R6.1 68.516,11.494 68.58,11.43 ; R29.2@67.564,48.311 R29.2 69.152,48.197 69.215,48.26 ; R3.2 C41.1 82.233,21.907 82.55,22.225
  Bottom Layer w0.254: v1(53.34,16.764) 53.34,15.24 54.102,14.478 56.896,14.478 v1(56.921,14.453)
  other v1: 72.136,9.398 73.66,9.398 75.184,9.398 76.708,9.398 78.232,9.398 79.756,9.398 84.328,14.478 85.852,14.478 87.376,14.478 88.9,14.478 84.328,15.748 85.852,15.748 87.376,15.748 88.9,15.748 84.328,17.272 85.852,17.272 87.376,17.272 88.9,17.272 84.582,21.59 86.106,21.59 87.63,21.59 84.582,22.86 86.106,22.86 87.63,22.86 84.582,24.13 86.106,24.13 87.63,24.13 84.582,25.4 86.106,25.4 87.63,25.4 84.582,26.67 86.106,26.67 87.63,26.67 84.582,27.94 86.106,27.94 87.63,27.94 84.582,29.718 86.36,29.845 87.63,29.845 86.36,31.115 87.63,31.115 84.582,31.242 86.36,32.385 87.63,32.385 84.582,32.766 86.36,33.655 87.63,33.655 79.248,34.544 81.026,34.544 82.804,34.544 84.582,34.544 86.36,34.925 87.63,34.925 79.248,36.068 81.026,36.068 82.804,36.068 84.582,36.068 86.36,36.195 87.63,36.195 79.248,37.592 81.026,37.592 82.804,37.592 84.582,37.592 79.248,39.116 81.026,39.116 82.804,39.116 84.582,39.116 79.248,40.64 81.026,40.64 82.804,40.64 84.582,40.64 86.106,40.64 84.582,42.164 86.106,42.164 84.582,43.688 86.106,43.688 72.772,51.066 74.168,51.054 75.692,51.054 77.216,51.054 78.74,51.054 80.518,51.054
48V: C1.1 C2.1 C3.1 C4.1 C5.1 C6.1 C42.1 C43.1 C44.1 C45.1 Q1.5 Q1.6 Q1.7 Q1.8 Q1.9 Q1.10 Q1.11 Q2.5 Q2.6 Q2.7 Q2.8 Q2.9 Q2.10 Q2.11 Q7.5 Q7.6 Q7.7 Q7.8 Q7.9 Q7.10 Q7.11 Q8.5 Q8.6 Q8.7 Q8.8 Q8.9 Q8.10 Q8.11 R1.2 R7.2 U2.1 | length 42.1
  Top Layer w0.254: v1(47.676,35.839) 47.681,35.834 R1.2 ; v1(48.311,16.256) 48.407,16.256 48.598,16.065 R7.2
  Bottom Layer w0.254: v1(47.676,35.839) 47.676,16.891 v1(48.311,16.256)
  Bottom Layer w0.508: v1(43.713,4.521) 45.237,6.045 45.237,13.183 v1(48.311,16.256)
  other v1: 9.398,4.064 11.176,4.064 12.954,4.064 14.732,4.064 16.51,4.064 18.542,4.064 9.398,5.842 11.176,5.842 12.954,5.842 14.732,5.842 16.51,5.842 18.542,5.842 11.176,24.13 13.208,24.13 15.24,24.13 11.176,26.162 13.208,26.162 15.24,26.162 11.176,28.194 13.208,28.194 15.24,28.194 11.176,30.48 13.208,30.48 15.24,30.48 11.176,32.512 13.208,32.512 15.24,32.512 11.176,34.798 13.208,34.798 15.24,34.798 11.176,37.084 13.208,37.084 15.24,37.084 10.668,55.372 12.192,55.372 13.97,55.372 15.494,55.372 30.226,56.134 32.004,56.134 34.036,56.134 35.814,56.134 37.592,56.134 39.37,56.134
EN1: C7.2 R1.1 R5.2 R52.2 U1.30 | length 40.2
  Top Layer w0.254: v1(47.625,38.811) 49.84,38.811 49.987,38.664 49.987,37.665 50.468,37.184 51.589,37.184 R5.2 C7.2 55.437,37.911 55.63,37.911 55.753,38.034 R52.2 ; v1(62.23,24.536) 62.344,24.651 U1.30
  Bottom Layer w0.254: v1(47.625,38.811) 47.625,37.465 49.301,35.789 49.301,25.654 50.419,24.536 v1(62.23,24.536)
EN2: R52.1 R53.2 U1.12 | length 13.3
  Top Layer w0.254: v1(54.889,34.341) 54.889,35.839 55.11,36.06 R53.2 R52.1 ; U1.12 61.844,33.396 v1(62.154,33.706)
  Bottom Layer w0.254: v1(54.889,34.341) 54.889,33.855 55.038,33.706 v1(62.154,33.706)
GND: C1.2 C2.2 C3.2 C4.2 C5.2 C6.2 C7.1 C8.2 C11.2 C12.1 C15.1 C18.1 C19.1 C20.1 C21.2 C22.2 C23.1 C24.1 C25.1 C26.2 C27.1 C28.1 C33.1 C34.2 C35.2 C36.2 C37.2 C38.2 C41.2 C42.2 C43.2 C44.2 C45.2 C47.1 C48.1 C49.2 C50.2 pad.0 Q3.1 Q3.2 Q3.3 Q4.1 Q4.2 Q4.3 Q5.1 Q5.2 Q5.3 Q6.1 Q6.2 Q6.3 R5.1 R8.1 R11.1 R12.1 R18.1 R19.1 R27.2 R40.1 R53.1 R54.1 U1.21 U1.33 U2.2 U3.2 | length 49.5
  Top Layer w0.254: C11.2 49.606,20.987 49.606,19.761 50.013,19.355 v1(50.648,19.355) ; R5.1 C7.1 v1(53.975,40.081) ; v1(52.629,28.423) 52.908,28.702 C26.2 ; C8.2 52.781,21.336 53.061,21.057 54.289,21.057 C50.2 54.407,20.088 54.788,19.707 v1(54.788,19.634) ; R53.1 55.753,35.01 56.422,34.341 v1(56.498,34.341) ; C49.2 56.566,18.765 56.921,18.41 v1(56.921,18.313) v1@56.972,18.313 ; v1(58.547,20.396) C12.1 ; U1.21 61.346,29.215 U1.33 61.722,29.337 v1(61.722,29.21) 62.479,29.21 U1.33@62.484,29.215 ; C47.1 59.944,39.726 v1(59.969,39.751) ; C48.1 v1(62.23,39.726) ; v1(62.865,17.907) R11.1 ; R8.1 64.821,21.933 R12.1 v1(64.846,20.447) ; R54.1 65.253,24.638 v1(65.43,24.46) ; v1(66.726,34.392) 66.726,34.488 66.929,34.691 R27.2 ; v1(68.021,22.352) C15.1 ; C22.2 68.796,27.153 v1(70.206,27.153) ; R40.1 C33.1 v1(72.657,37.655) v1@72.669,37.668 ; C28.1 C25.1 R19.1 71.526,29.553 71.526,28.775 71.675,28.626 v1(72.822,28.626) ; R18.1 72.657,21.654 v1(73.05,21.26) ; C27.1 73.549,29.753 v1(73.558,29.743) ; C24.1 v1(77.978,26.416) ; v1(79.375,19.05) C41.2
  other v1: 7.62,1.27 9.525,1.27 11.43,1.27 13.335,1.27 15.24,1.27 17.145,1.27 19.05,1.27 20.955,1.27 22.86,1.27 24.765,1.27 26.67,1.27 28.575,1.27 30.48,1.27 32.385,1.27 34.29,1.27 36.195,1.27 38.1,1.27 40.005,1.27 41.91,1.27 43.815,1.27 45.72,1.27 47.625,1.27 49.53,1.27 51.435,1.27 53.34,1.27 55.245,1.27 57.15,1.27 59.055,1.27 60.96,1.27 62.865,1.27 64.77,1.27 66.675,1.27 68.58,1.27 70.485,1.27 72.39,1.27 74.295,1.27 76.2,1.27 78.105,1.27 80.01,1.27 81.915,1.27 83.82,1.27 85.725,1.27 87.63,1.27 89.535,1.27 91.44,1.27 91.44,3.175 53.34,3.81 55.245,3.81 91.44,5.08 53.34,5.715 55.245,5.715 91.44,6.985 1.27,7.62 53.34,7.62 55.245,7.62 93.345,8.255 95.25,8.255 97.155,8.255 98.425,8.89 1.27,9.525 53.34,9.525 55.245,9.525 98.425,10.795 1.27,11.43 53.34,11.43 55.245,11.43 98.425,12.7 1.27,13.335 53.34,13.335 55.245,13.335 98.425,14.605 70.333,14.656 71.526,14.656 69.113,14.681 1.27,15.24 70.333,16.231 71.532,16.235 69.139,16.256 72.898,16.256 74.422,16.256 76.2,16.256 77.724,16.256 79.502,16.256 98.425,16.51 1.27,17.145 98.425,18.415 1.27,19.05 98.425,20.32 1.27,20.955 98.425,22.225 24.765,22.86 26.67,22.86 24.765,24.765 26.67,24.765 24.765,26.67 26.67,26.67 44.45,28.169 40.361,28.219 41.275,28.219 42.139,28.219 43.028,28.245 60.452,28.448 61.214,28.448 61.976,28.448 62.738,28.448 24.765,28.575 26.67,28.575 33.757,28.854 34.696,28.854 32.817,28.88 35.611,28.88 40.31,29.185 41.275,29.185 42.139,29.185 43.002,29.185 60.267,29.215 60.96,29.21 62.484,29.21 44.45,29.286 32.766,29.769 33.757,29.769 34.646,29.769 35.611,29.769 60.452,29.972 61.214,29.972 61.976,29.972 62.738,29.972 44.45,30.328 24.765,30.48 26.67,30.48 60.198,30.734 60.96,30.734 61.722,30.734 62.484,30.734 39.294,30.988 41.097,30.988 38.405,31.013 40.183,31.013 33.274,31.242 34.138,31.242 31.496,31.267 32.385,31.267 44.45,31.471 38.405,31.801 39.294,31.801 40.183,31.801 41.097,31.826 31.521,32.283 32.41,32.283 33.249,32.283 34.112,32.283 24.765,32.385 26.67,32.385 24.765,34.29 26.67,34.29 24.765,36.195 26.67,36.195 24.765,38.1 26.67,38.1 99.06,38.1 1.27,40.005 99.06,40.005 1.27,41.91 99.06,41.91 73.152,43.688 74.422,43.688 75.692,43.688 76.962,43.688 78.232,43.688 79.502,43.688 1.27,43.815 53.34,43.815 55.245,43.815 99.06,43.815 1.27,45.72 53.34,45.72 55.245,45.72 99.06,45.72 1.27,47.625 53.34,47.625 55.245,47.625 99.06,47.625 1.27,49.53 53.34,49.53 55.245,49.53 99.06,49.53 1.27,51.435 53.34,51.435 55.245,51.435 99.06,51.435 98.12,52.654 93.294,52.68 91.44,52.705 53.34,53.34 55.245,53.34 91.44,54.61 91.44,56.515 7.62,58.42 9.398,58.42 11.43,58.42 13.335,58.42 15.24,58.42 17.145,58.42 19.05,58.42 20.955,58.42 22.86,58.42 24.765,58.42 26.67,58.42 28.575,58.42 30.48,58.42 32.385,58.42 34.29,58.42 36.195,58.42 38.1,58.42 40.005,58.42 41.91,58.42 43.815,58.42 45.72,58.42 47.625,58.42 49.53,58.42 51.435,58.42 53.34,58.42 55.245,58.42 57.15,58.42 59.055,58.42 60.96,58.42 62.865,58.42 64.77,58.42 66.675,58.42 68.58,58.42 70.485,58.42 72.39,58.42 74.295,58.42 76.2,58.42 78.105,58.42 80.01,58.42 81.915,58.42 83.82,58.42 85.725,58.42 87.63,58.42 89.535,58.42 91.44,58.42
NetC8_1: C8.1 R7.1 U1.27 | length 18.9
  Top Layer w0.254: R7.1 54.61,18.796 54.077,19.329 53.416,19.329 51.918,20.828 51.918,23.165 52.291,23.538 C8.1 52.781,24.075 53.294,24.587 55.143,24.587 55.55,24.994 60.212,24.994 60.843,25.625 U1.27
NetC9_1: C9.1 R11.2 | length 2.6
  Top Layer w0.254: C9.1@60.579,21.082 60.579,21.052 61.127,20.504 61.157,20.504 61.341,20.32 R11.2
NetC9_2: C9.2 C12.2 R8.2 U1.31 | length 8.9
  Top Layer w0.254: C12.2@58.547,23.431 58.897,23.082 60.579,23.082 63.074,23.082 R8.2 63.322,24.79 62.845,25.268 U1.31
NetC11_1: C11.1 D1.1 U1.26 | length 20.8
  Top Layer w0.254: D1.1@49.504,17.78 49.351,17.933 48.59,17.933 47.981,18.542 47.981,22.733 48.412,23.165 C11.1 50.8,23.165 51.587,23.952 52.012,23.952 53.104,25.044 54.954,25.044 55.386,25.476 59.739,25.476 60.345,26.082 U1.26
NetC15_2: C15.2 C17.2 U1.1 | length 9.5
  Top Layer w0.254: U1.1 64.659,27.714 64.916,27.457 65.608,27.457 66.446,26.619 66.446,23.851 66.954,23.343 69.079,23.343 C15.2 69.092,23.356 70.1,23.356 C17.2
NetC16_1: C16.1 R16.2 | length 4
  Top Layer w0.254: R16.2 51.901,25.781 52.79,26.67 C16.1
NetC16_2: C16.2 L1.1 Q1.1 Q1.2 Q1.3 Q2.1 Q2.2 Q2.3 Q3.5 Q3.6 Q3.7 Q3.8 Q3.9 Q3.10 Q3.11 Q4.5 Q4.6 Q4.7 Q4.8 Q4.9 Q4.10 Q4.11 U1.24 | length 16.1
  Top Layer w0.254: 44.628,24.867 51.633,24.867 52.726,25.959 54.556,25.959 55.013,26.416 55.181,26.416 C16.2 58.699,26.67 59.187,27.158 U1.24
NetC17_1: C17.1 R18.2 | length 1.7
  Top Layer w0.254: C17.1 70.81,22.36 R18.2
NetC22_1: C22.1 U1.2 | length 3.8
  Top Layer w0.254: U1.2 64.805,28.214 65.04,27.98 66.572,27.98 C22.1
NetC25_2: C25.2 R19.2 U1.5 | length 8
  Top Layer w0.254: U1.5 69.789,29.715 R19.2@69.952,29.553 ; R19.2@70.04,29.464 C25.2
NetC26_1: C26.1 D3.2 D4.2 U1.20 | length 15
  Top Layer w0.254: D4.2 51.486,30.607 v1(51.613,30.48) ; v1(51.613,28.397) 50.902,28.397 50.791,28.286 50.691,28.286 50.318,27.913 D3.2 50.572,27.559 54.834,27.559 55.977,28.702 56.037,28.702 56.916,29.581 57.57,29.581 57.664,29.487 58.519,29.487 58.718,29.685 58.864,29.685 58.882,29.703 59.174,29.703 U1.20
  Bottom Layer w0.254: v1(51.613,28.397) v1(51.613,30.48)
NetC27_2: C27.2 R20.1 | length 3.1
  Top Layer w0.254: R20.1 75.387,33.02 75.692,32.715 75.692,31.233 C27.2
NetC28_2: C28.2 R20.2 U1.6 | length 12
  Top Layer w0.254: U1.6 68.443,30.216 68.936,30.709 68.936,32.766 69.19,33.02 C28.2 70.752,33.731 72.314,33.731 R20.2
NetC33_2: C33.2 U1.7 | length 11.9
  Top Layer w0.254: U1.7 68.026,30.714 68.478,31.166 68.478,33.503 69.19,34.214 70.79,34.214 71.349,34.773 71.349,36.233 C33.2